# Altium PCB MB_v3.PcbDoc (part 3 of 11)
Units mm, origin at the board's own origin, x right, y up, seen from the top; angles counter-clockwise.
Board outline 203 x 72 mm, 6 copper layers (Top Layer, Layer 3, Layer 1, Layer 2, Layer 4, Bottom Layer), stack 1.52 mm thick; 726 components, 608 nets, 3144 pads, 2508 vias.
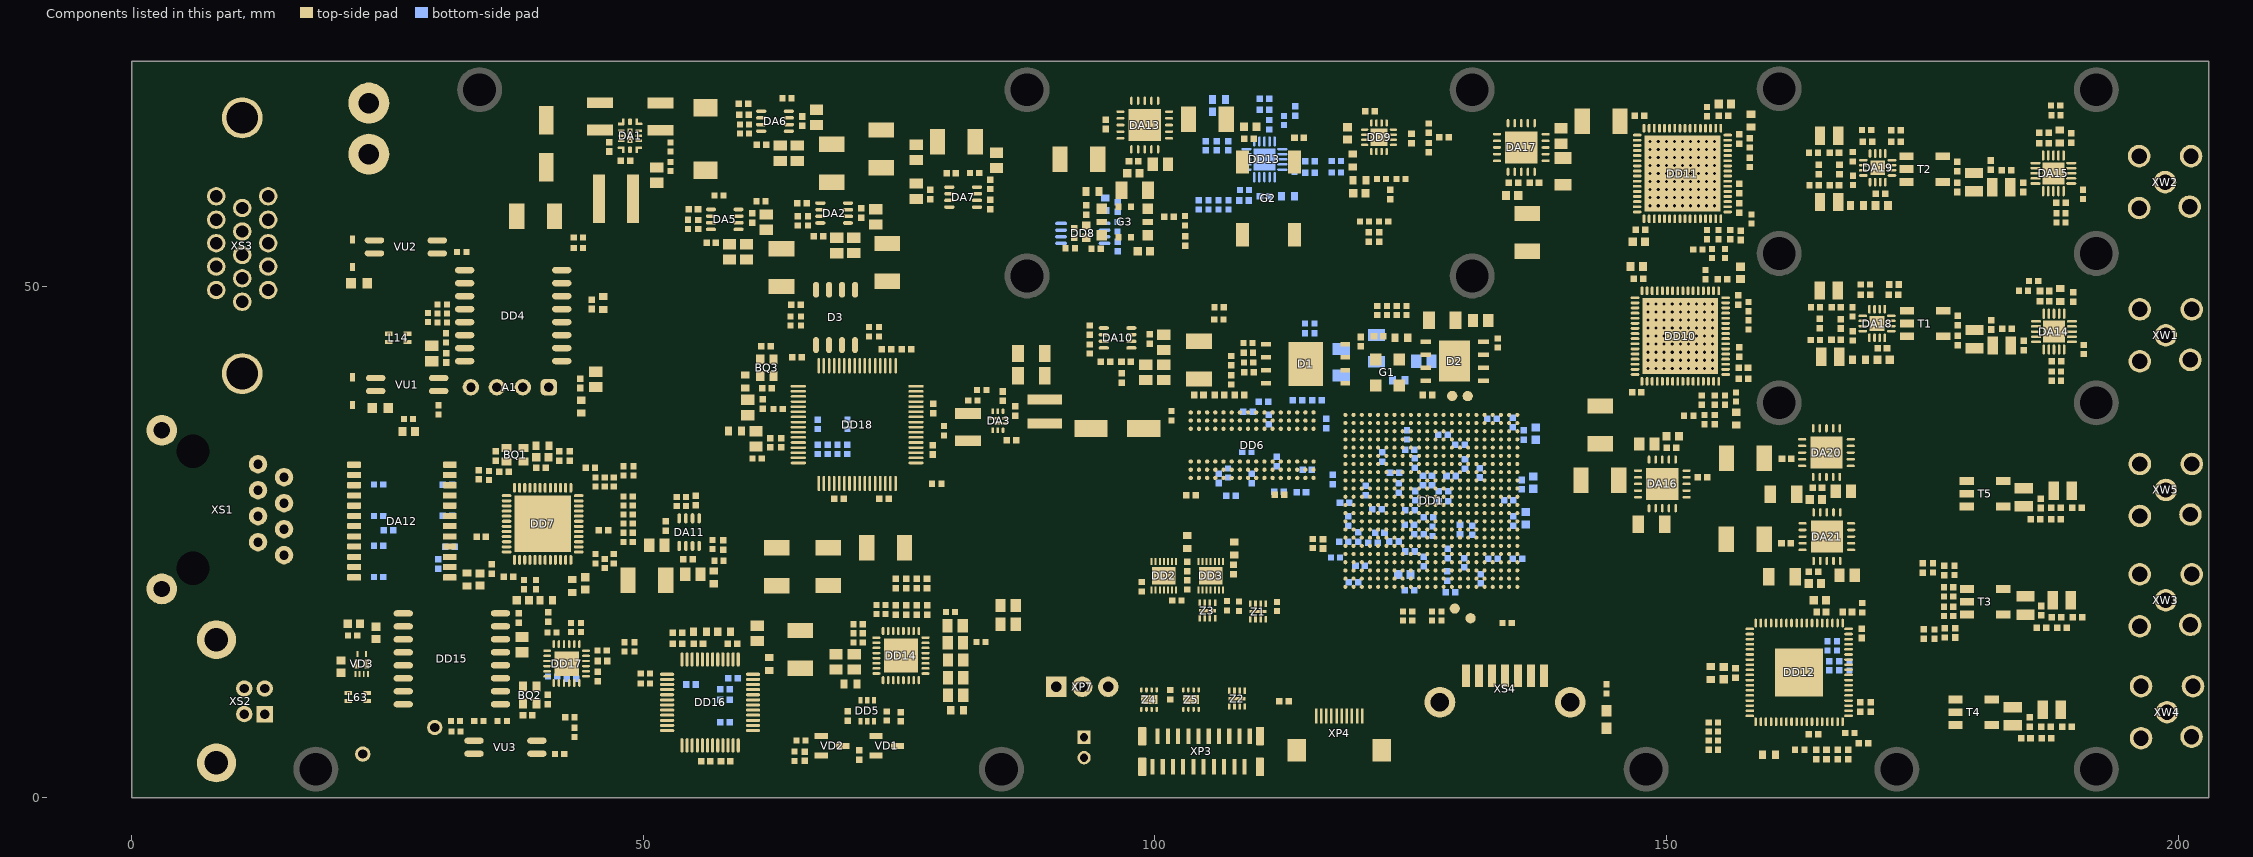
[diagram p6: the components of this part, seen from the top]

## Part data (continued)
DD1: library part "Микросхема XC7Z020-2CLG484I", "Zynq®-7000 SoC Family", Manufacturer=XILINX, ComponentLink1Description=datasheet, ComponentLink1URL=https://www.xilinx.com/support/documentation/data_sheets/ds925-zynq-ultrascale-plus.pdf
DD2 DD3: library part "Микросхема MAX13433EETD+", "RS-422 Transceivers with Low-Voltage Logic Interface 16M", Manufacturer=Maxim, ComponentLink1Description=datasheet, ComponentLink1URL=https://datasheets.maximintegrated.com/en/ds/MAX13430E-MAX13433E.pdf
DD4: library part "Микросхема ISO3080DWR", "ISOLATED 5-V FULL DUPLEX RS-485 TRANSCEIVERS 200 kbps", Manufacturer=TI
DD5: library part "Микросхема SN74LVC2G14DCKR", "Dual Schmitt-Trigger Inverter", Manufacturer=TI, ComponentLink1Description=datasheet, ComponentLink1URL=http://www.ti.com/lit/ds/symlink/sn74auc1g04.pdf
DD6: library part "Микросхема MT41K256M16TW-107", "4Gb, x16, 1.35V DDR3L", Manufacturer=Micron, Op. Temp.="0C to +95C", Package=FBGA, PartNumber=MT41K128M16JT-125, Voltage=1.35V, CL="CL = 13", Clock Rate="667 MHz", ComponentLink1Description="Manufacturer URL", ComponentLink1URL=http://www.micron.com/, ComponentLink2Description=Datasheet, ComponentLink2URL=http://www.micron.com/~/media/Documents/Products/Data%20Sheet/DRAM/2Gb_DDR3_SDRAM.pdf, ComponentLink3Description="Package Specification", ComponentLink3URL=http://www.micron.com/~/media/Documents/Products/Data%20Sheet/DRAM/2Gb_DDR3_SDRAM.pdf, Cycle Time=1.07ns, Data Rate=DDR3-1866, DatasheetVersion=Rev.F, Density=2Gb, Depth=256M16, Mounting Technology="Surface Mount", PackageDescription="96-Ball Fine-Pitch Ball Grid Array, 14 x 8 mm, Pitch 0.8 mm", PackageReference=MICT-JT-96, PackageVersion=Rev.G, Pin Count=96-ball, RoHS=Yes, Width=x16
DD7: library part "Микросхема KSZ9031RNXIC", "Gigabit Ethernet Transceiver with Power Saving Features", Built_By=EMA_Cory, Copyright="Copyright (C) 2018 Accelerated Designs. All rights reserved", Datasheet=https://ww1.microchip.com/downloads/en/DeviceDoc/00002117F.pdf, Manufacturer_Part_Number=KSZ9031RNXIC, RefDes=RefDes, SourceLibrary=Add_to_database_2020-10-19, TYPE=DEV, Vendor=Microchip
DD8: library part "Микросхема DAC8571IDGKR", "16-BIT, LOW POWER, VOLTAGE OUTPUT, I2C INTERFACE DIGITAL-TO-ANALOG  CONVERTER", Manufacturer=TI, ComponentLink1Description=datasheet, ComponentLink1URL=http://www.ti.com/lit/ds/slas373a/slas373a.pdf
DD9: library part "Микросхема ADCLK944BCPZ", "2.5 V/3.3 V, Four LVPECL Outputs,  SiGe Clock Fanout Buffer", Manufacturer=TI, ComponentLink1Description=datasheet, ComponentLink1URL=http://www.analog.com/media/en/technical-documentation/data-sheets/ADCLK944.pdf
DD10 DD11: library part "Микросхема LTC2208CUP", "16-Bit, 130Msps ADC", Manufactured=Linear, ComponentLink1Description=datasheet, ComponentLink1URL=https://www.analog.com/media/en/technical-documentation/data-sheets/2208fc.pdf
DD12: library part "Микросхема AD9783BCPZ", "Dual 12-/14-/16-Bit, LVDS Interface, 500 MSPS DACs", Manufacturer=AD, ComponentLink1Description=datasheet, ComponentLink1URL=http://www.analog.com/media/en/technical-documentation/data-sheets/AD9780_9781_9783.pdf
DD13: library part "Микросхема ADF4002BCPZ", "Phase Detector/Frequency Synthesizer", Manufacturer="Analog Devices", ComponentLink1Description=datasheet, ComponentLink1URL=http://www.analog.com/media/en/technical-documentation/data-sheets/ADF4002.pdf
DD14: library part "Микросхема NAU8822AYG", "24-bit Stereo Audio Codec with Speaker Driver", Manufacturer=NUVOTON
DD15: library part "Микросхема ADuM3160", "Full/Low Speed 2.5 kV USB Digital Isolator", Manufacturer=AD, ComponentLink1Description=datasheet, ComponentLink1URL=https://www.analog.com/media/en/technical-documentation/data-sheets/ADuM5210_5211_5212.pdf